# Altium PCB STM32F103C8T6核心板.PcbDoc
Units mil, origin at the board's own origin, x right, y up, seen from the top; angles counter-clockwise.
Board outline 4166 x 2426 mil, 2 copper layers (Top Layer, Bottom Layer); 45 components, 35 nets, 190 pads, 10 vias.
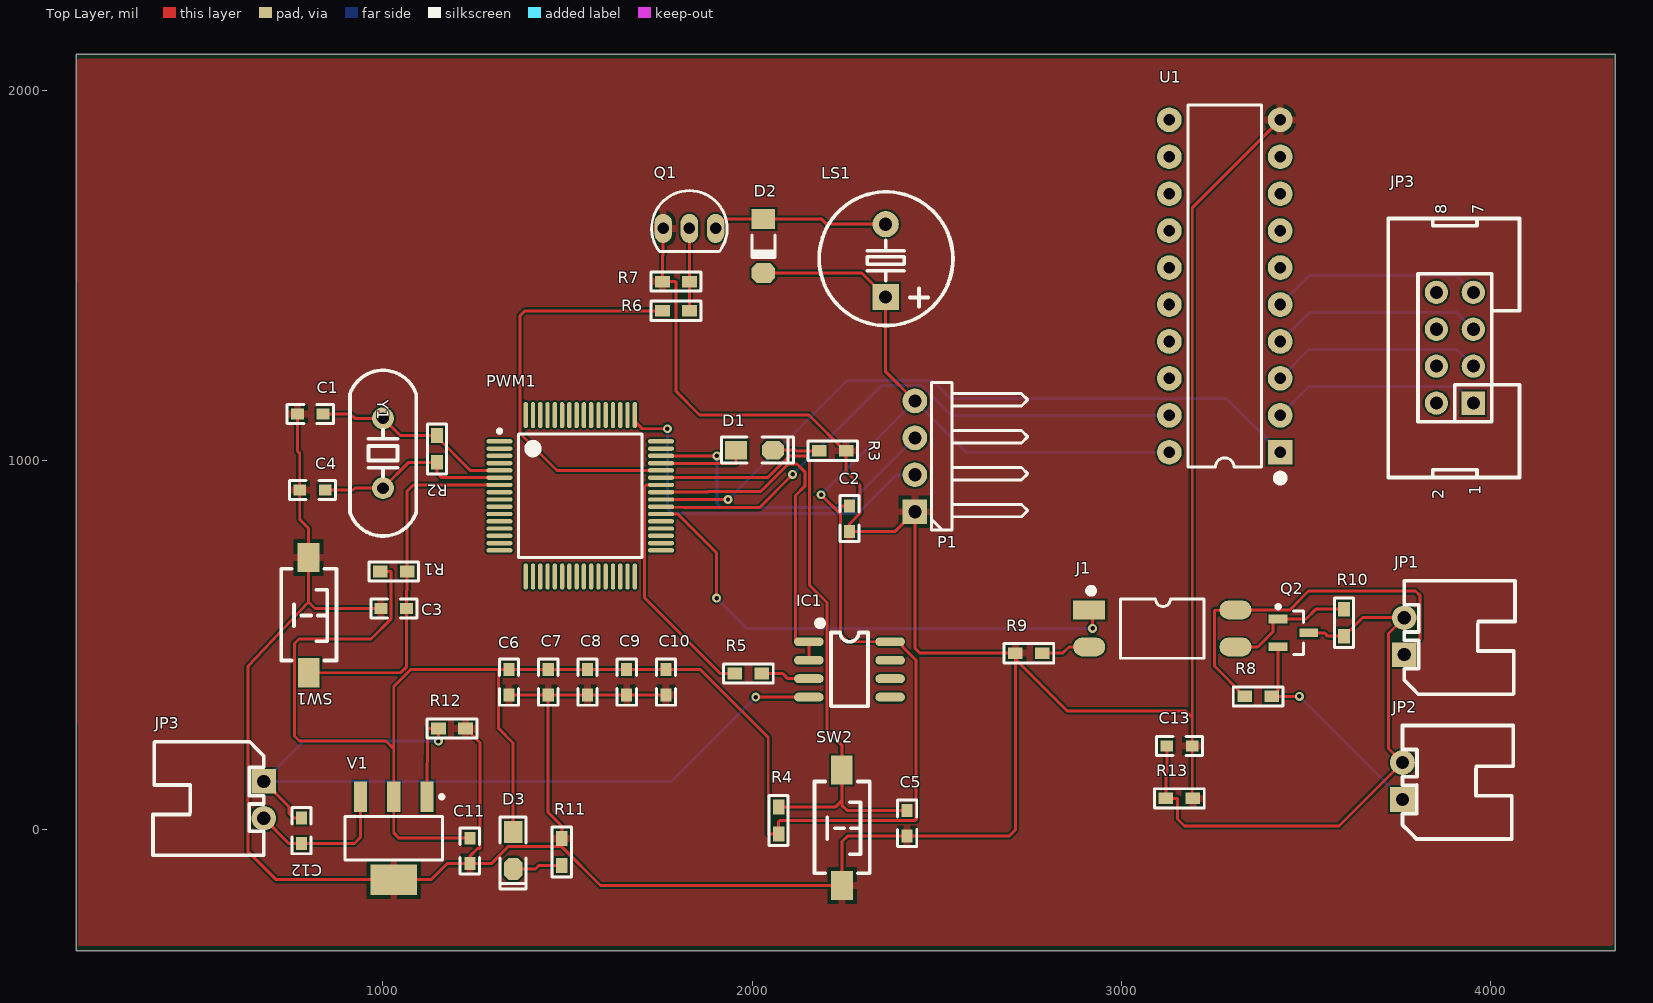
[diagram p0: Top Layer view]
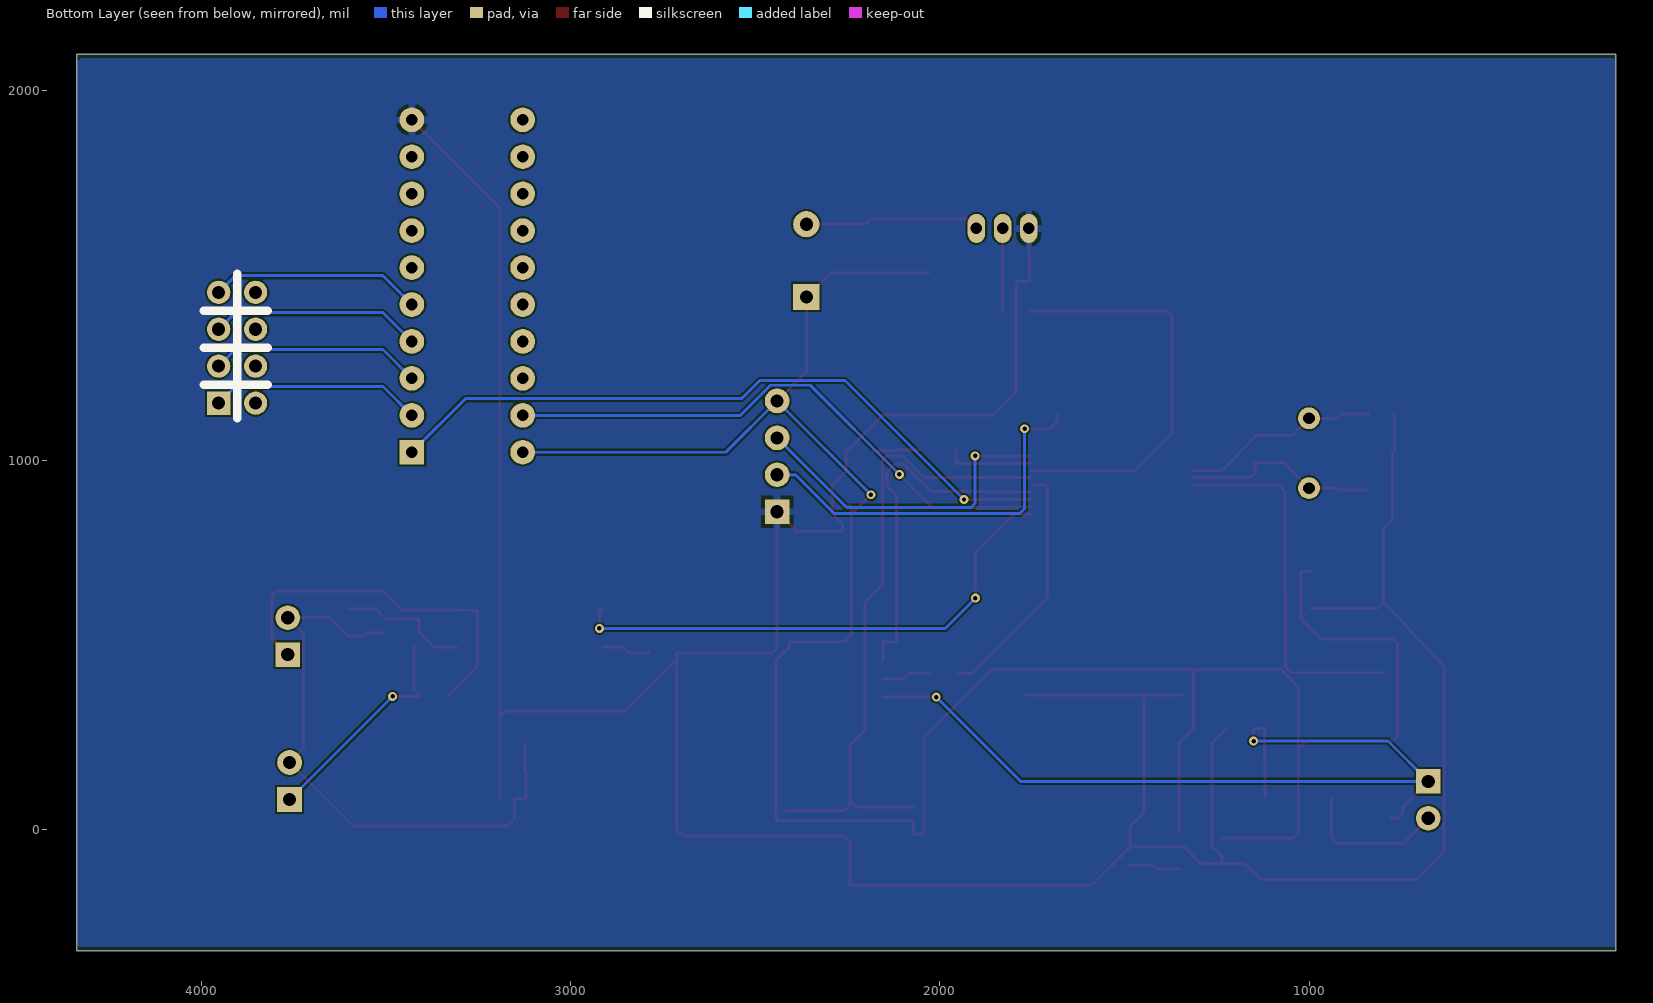
[diagram p1: Bottom Layer view, seen from below]

## Layer stack, top to bottom
Top Solder: solder mask 0.4, Solder Resist, Dk 3.5
Top Layer: signal copper 1.4
Dielectric1: dielectric 12.6, FR-4, Dk 4.8
Bottom Layer: signal copper 1.4
Bottom Solder: solder mask 0.4, Solder Resist, Dk 3.5

## Board outline
171,-328 171,2098 4337,2098 4337,-328

## Design rules (kind name [scope] priority, off if disabled: settings)
Clearance [All] p1: gap=5 ignorepadtopadclearanceinfootprint=FALSE except(0: Arc-Hole Track-Hole SMDPad-Hole THPad-Hole Via-Hole Fill-Hole Poly-Hole Region-Hole Text-Hole)
FabricationTestPointUsage TestPointUsage [All] p1: valid=0 allowmultiple=FALSE
FabricationTestpoint Testpoint [(IsPad And (OnTopLayer Or OnBottomLayer))] p1: side=3 testpointundercomponent=TRUE minsize=40 maxsize=100 preferedsize=60 minholesize=0 maxholesize=40 preferedholesize=32 testpointgrid=1 allowsidetop=TRUE allowsidebottom=TRUE usegrid=TRUE gridtolerance=0.01
HoleToHoleClearance [All] p1: gap=0 allowstackedmicrovias=TRUE
MinimumSolderMaskSliver [All] p1: minsoldermaskwidth=0
PolygonConnect PolygonConnect_1 [All vs (InPadClass('All Pads'))] p1: connectstyle=Relief reliefconductorwidth=20 reliefentries=4 polygonreliefangle="90 Angle" airgapwidth=10
PolygonConnect [All] p2: connectstyle=Direct reliefconductorwidth=20 reliefentries=4 polygonreliefangle="90 Angle" airgapwidth=10
RoutingVias [All] p1: holewidth=12 width=24 viastyle="Through Hole" minholewidth=12 minwidth=24 maxholewidth=50 maxwidth=100
SilkToSilkClearance [All] p1: silktosilkclearance=0
SilkToSolderMaskClearance SilkscreenOverComponentPads [IsPad] p1: minsilkscreentomaskgap=0 clearancetoexposedcopper=TRUE
SolderMaskExpansion [All] p1: expansion=4 istentingtop=FALSE
Width [All] p1: maxlimit=20 minlimit=6 preferedwidth=8
24 further rules are at their usual default settings.

## Components (designator, comment, footprint, x,y, rotation, side; value= is the part's Value field where it differs from the comment)
C1 "22P,0603" "C 0603" 803.5,1124.64 r180 top value=104
C2 "104,0603" "C 0603" 2264,842 r90 top value=104
C3 "2.2uf" "C 0603" 1031,598 r0 top value=104
C4 "22P,0603" "C 0603" 809.5,918.64 r180 top value=104
C5 "2.2uf" "C 0603" 2420,17 r90 top value=104
C6 "100nf" "C 0603" 1342,399 r90 top value=104
C7 "100nf" "C 0603" 1448.25,399 r90 top value=104
C8 "100nf" "C 0603" 1554.5,399 r90 top value=104
C9 "100nf" "C 0603" 1660.75,399 r90 top value=104
C10 "100nf" "C 0603" 1767,399 r90 top value=104
C11 "100nf" "C 0603" 1236,-59 r270 top value=104
C12 "10uf" "C 0603" 780,-4 r270 top value=104
C13 "100nf" "C 0603" 3158,226 r0 top value=104
D1 "LED" "LED 0805G" 2007,1027 r0 top
D2 "1N4148" "MINI_MELF (LL34)" 2031,1579 r270 top
D3 "LED" "LED 0805G" 1353,-57 r270 top
IC1 "LM358" SOP8_N 2264,433 r0 top
J1 "TLP181" SOP4-W2.54_N 3111,544 r0 top
JP1 "HDR-1X2" XH2.54-WI-2P 3766,523 r90 top
JP2 "HDR-1X2" XH2.54-WI-2P 3761,131 r90 top
JP3 "HDR-1X2" XH2.54-WI-2P 678,80 r270 top
JP3 "Header 4X2" IDC2.54-LI-2x4P 3953,1154 r90 top
LS1 "DC5V" "BEEP 5x9x5.5" 2362,1540 r0 top
P1 "SWD" HDR-1X4_H 2441,860 r90 top
PWM1 "STM32F107RBT6" LQFP64_N 1535,903 r0 top
Q1 "S9013" TO92A 1830.5,1627.03 r0 top
Q2 "N沟道" SOT23-3N 3466,532 r0 top
R1 "10K,0603" "R 0603" 1030,698 r180 top
R2 "1M0603" "R 0603" 1147,1030.17 r90 top
R3 "1k" "R 0603" 2218.5,1025 r0 top
R4 "10k" "R 0603" 2072,24 r270 top
R5 "1k" "R 0603" 1990,422 r0 top
R6 "1k" "R 0603" 1794,1404 r0 top
R7 "1k" "R 0603" 1794,1483 r0 top
R8 "4.7k" "R 0603" 3370.5,360 r180 top
R9 "100R" "R 0603" 2749.5,477 r0 top
R10 "100R" "R 0603" 3603,559.5 r90 top
R11 "1k" "R 0603" 1485,-61 r90 top
R12 "1k" "R 0603" 1188,273 r0 top
R13 "1M" "R 0603" 3157,84 r0 top
SW1 "SW-PB_V" "TSW SMD-3*6*2.5" 800,579 r270 top
SW2 "SW-PB_V" "TSW SMD-3*6*2.5" 2244,3 r270 top
U1 "SN74LV245" DIP-20 3280,1471 r180 top
V1 "AMS1117-3V3" SOT223_L 1030,-24 r270 top
Y1 "8M" "XTAL-49S DIP" 1001,1018.49 r90 top

## Footprints (in the part's own frame and the unit in brackets; to place one, negate y for a bottom-side part, rotate by r counter-clockwise, add the part's x,y. Pads: shape width x height; smd on the part's side, far side on the other; paste and mask are expansions set on the pad)
"BEEP 5x9x5.5" [mm] "5*9*5.5mm(脚距,直径,高度)        淘宝ID:黄晶宝石"
  rect 1.8x1.8 hole 0.9: 1(0,-2.5)
  round 1.8 hole 0.9: 2(0,2.5)
  silkscreen extent -4.58,-4.47 4.62,4.72, body extent -4.5,-4.5 4.5,4.5, height 5.45
"C 0603" [mil] "无极性贴片电容"
  rect 35x30 smd: 1(-35,0) 2(34,0)
  silkscreen extent -63,-26 62,26, body extent -31,-16 31,16, height 32
DIP-20 [mm] "26.4*7.6*3.8(长宽高）淘宝ID:黄晶宝石   店铺网址:https://shop463601444.taobao.com"
  rect 1.7x1.7 hole 0.8: 1(-3.81,11.43)
  round 1.7 hole 0.8: 2(-3.81,8.89) 3(-3.81,6.35) 4(-3.81,3.81) 5(-3.81,1.27) 6(-3.81,-1.27) 7(-3.81,-3.81) 8(-3.81,-6.35) 9(-3.81,-8.89) 10(-3.81,-11.43) 11(3.81,-11.43) 12(3.81,-8.89) 13(3.81,-6.35) 14(3.81,-3.81) 15(3.81,-1.27) 16(3.81,1.27) 17(3.81,3.81) 18(3.81,6.35) 19(3.81,8.89) 20(3.81,11.43)
  silkscreen extent -4.06,-12.45 2.54,13.46, body extent -4,-13.2 4,13.2, height 4.5
HDR-1X4_H [mm] "弯脚排针，4脚"
  rect 1.7x1.7 hole 0.9: 1(0,0)
  round 1.7 hole 0.9: 2(2.54,0) 3(5.08,0) 4(7.62,0)
  silkscreen extent -1.27,-7.76 8.89,-1.14, body extent -1.27,-7.77 8.89,1.27, height 4.85
IDC2.54-LI-2x4P [mm] "8P简易牛角座 淘宝ID:黄晶宝石   店铺网址:https://shop463601444.taobao.com"
  rect 1.6x1.6 hole 0.9: 1(0,0)
  round 1.6 hole 0.9: 2(0,2.54) 3(2.54,0) 4(2.54,2.54) 5(5.08,0) 6(5.08,2.54) 7(7.62,0) 8(7.62,2.54)
  silkscreen extent -5.11,-3.18 12.7,5.84, body extent -5.08,-3.08 12.7,5.77, height 9.17
"LED 0805G" [mil] "绿色0805LED"
  rect 60x50 smd: 1(-50,0)
  oct 60x50 smd: 2(50,0)
  silkscreen extent -90,-35 105,35, body extent -39,-25 39,25, height 32
LQFP64_N [mm] "Thin QFP, 64-Leads, Body 10x10mm, Pitch 0.5mm, IPC Medium Density封装库来自淘宝 ID：黄晶宝石"
  oval 1.8x0.3 smd: 1(-5.55,3.75) 2(-5.55,3.25) 3(-5.55,2.75) 4(-5.55,2.25) 5(-5.55,1.75) 6(-5.55,1.25) 7(-5.55,0.75) 8(-5.55,0.25) 9(-5.55,-0.25) 10(-5.55,-0.75) 11(-5.55,-1.25) 12(-5.55,-1.75) 13(-5.55,-2.25) 14(-5.55,-2.75) 15(-5.55,-3.25) 16(-5.55,-3.75) 33(5.55,-3.75) 34(5.55,-3.25) 35(5.55,-2.75) 36(5.55,-2.25) 37(5.55,-1.75) 38(5.55,-1.25) 39(5.55,-0.75) 40(5.55,-0.25) 41(5.55,0.25) 42(5.55,0.75) 43(5.55,1.25) 44(5.55,1.75) 45(5.55,2.25) 46(5.55,2.75) 47(5.55,3.25) 48(5.55,3.75)
  oval 0.3x1.8 smd: 17(-3.75,-5.55) 18(-3.25,-5.55) 19(-2.75,-5.55) 20(-2.25,-5.55) 21(-1.75,-5.55) 22(-1.25,-5.55) 23(-0.75,-5.55) 24(-0.25,-5.55) 25(0.25,-5.55) 26(0.75,-5.55) 27(1.25,-5.55) 28(1.75,-5.55) 29(2.25,-5.55) 30(2.75,-5.55) 31(3.25,-5.55) 32(3.75,-5.55) 49(3.75,5.55) 50(3.25,5.55) 51(2.75,5.55) 52(2.25,5.55) 53(1.75,5.55) 54(1.25,5.55) 55(0.75,5.55) 56(0.25,5.55) 57(-0.25,5.55) 58(-0.75,5.55) 59(-1.25,5.55) 60(-1.75,5.55) 61(-2.25,5.55) 62(-2.75,5.55) 63(-3.25,5.55) 64(-3.75,5.55)
  silkscreen extent -5.67,-4.25 4.25,4.57, body extent -6,-6 6,6, height 1.45
"MINI_MELF (LL34)" [mm] "1.5*3.4mm(直径，脚距）"
  rect 1.37x1.62 smd: 1(-1.855,0)
  oct 1.37x1.62 smd: 2(1.855,0)
  silkscreen extent -0.76,-0.8 0.78,0.8, body extent -1.7,-0.75 1.7,0.75, height 1.5
"R 0603" [mil] "1/10W贴片电阻"
  rect 40x31.5 smd: 1(-36.5,0) 2(36.5,0)
  silkscreen extent -68,-26 68,26, body extent -31,-16 31,16, height 16
SOP4-W2.54_N [mm] "6.5*4.58*3.5mm（长宽高）  淘宝ID:黄晶宝石"
  rect 2.2x1.3 smd: 1(-5.029,1.27)
  oval 2.2x1.3 smd: 2(-5.029,-1.27) 3(5.029,-1.27) 4(5.029,1.27)
  silkscreen extent -5.06,-2.05 2.87,2.75, body extent -5,-2.29 5,2.29, height 3.6
SOP8_N [mil] "5*6*1.8mm（长宽高）"
  oval 80x24 smd: 1(-110,75) 2(-110,25) 3(-110,-25) 4(-110,-75) 5(110,-75) 6(110,-25) 7(110,25) 8(110,75)
  silkscreen extent -86,-100 50,131, body extent -118,-98 118,98, height 75
SOT23-3N [mm] "SOT23, 3-Leads, Body 2.9x1.3mm, Pitch 0.95mm, Lead Span 2.4mm, IPC Medium Density"
  rect 1.3x0.6 smd: 1(-1.05,0.95) 2(-1.05,-0.95) 3(1.05,0)
  silkscreen extent -1.17,-1.5 0.7,1.92, body extent -1.2,-1.5 1.2,1.5, height 1.05
SOT223_L [mm] "SOT223, 4-Leads, Body 6.5x3.5mm, Pitch 2.3mm, Lead Span 7mm, IPC High Density"
  rect 2.1x0.9 smd: 1(-2.85,2.3) 2(-2.85,0) 3(-2.85,-2.3)
  rect 2.1x3.2 smd: 4(2.85,0)
  silkscreen extent -2.97,-3.35 1.5,3.43, body extent -3.51,-3.25 3.51,3.25, height 1.65
TO92A [mm] "TO, Flat Index; 3 In-Line, Axial Leads; Body Dia. 4.8mm; Leads 0.48 x 0.5 mm (max)"
  oval 1.2x2 hole 0.8: 1(-1.8,0) 2(0,0) 3(1.8,0)
  silkscreen extent -2.6,-1.6 2.6,2.6, body extent -2.3,-1.3 2.3,2.3, height 7.6
"TSW SMD-3*6*2.5" [mm] "3*6*2.5mm"
  rect 2x1.5 smd: 1(-3.996,-0.02) 2(3.937,0)
  silkscreen extent -3.21,-1.9 3.09,1.9, body extent -4,-1.88 4,1.62, height 2.59
XH2.54-WI-2P [mm] "接插件，2P"
  rect 1.7x1.7 hole 0.9: 1(-1.27,0)
  round 1.7 hole 0.9: 2(1.27,0)
  silkscreen extent -3.99,-7.62 3.81,0, body extent -3.77,-7.35 3.77,0.35, height 5.75
"XTAL-49S DIP" [mm]
  round 1.5 hole 0.8: 1(-2.4,0) 2(2.4,0)
  silkscreen extent -5.7,-2.28 5.7,2.28, body extent -5.68,-2.35 5.68,2.3, height 3.5

## Part data
C1 C2 C3 C4 C5 C6 C7 C8 C9 C10 C11 C12 C13: library part Cap, "Capacitor", LatestRevisionDate=17-Jul-2002, LatestRevisionNote="Re-released for DXP Platform.", Published=8-Jun-2000, Publisher="Altium Limited"
D2: "开关二极管", BOM名称=高速开关二极管, 联系卖家，免费查找封装=唯一出售店铺网址https://shop463601444.taobao.com
IC1: "双路运放", BOM名称=双路运放, 联系卖家，免费查找封装=唯一出售店铺网址https://shop463601444.taobao.com
J1: library part TLP521-1, "1路开关光耦", BOM名称=1路开关光耦, 封装库来自 淘宝卖家 ID：黄晶宝石=其他店铺购入均为盗版假冒封装库，请立即申请退款
JP1 JP2 JP3: library part "Header 2", "2P接插件", BOM名称=2P接插件, 封装库来自淘宝卖家 ID：黄晶宝石=其他店铺购入均为盗版假冒封装库, 联系卖家，免费查找封装=唯一出售店铺网址https://shop463601444.taobao.com
JP3: "4*2P接插件", BOM名称=4*2P接插件, 封装库来自淘宝卖家 ID：黄晶宝石=其他店铺购入均为盗版假冒封装库, 联系卖家，免费查找封装=唯一出售店铺网址https://shop463601444.taobao.com
LS1: library part BEEP, "蜂鸣器", BOM名称=蜂鸣器, 联系卖家，免费查找封装=唯一出售店铺网址https://shop463601444.taobao.com
P1: library part "Header 4", "Header, 4-Pin", LatestRevisionDate=17-Jul-2002, LatestRevisionNote="Re-released for DXP Platform.", Publisher="Altium Limited"
PWM1: "STM32 ARM-based 32-bit MCU Connectivity Line & Ethernet with 128 kB Flash, 48 kB Internal RAM, -40 to +85癈 Temperature, 64-Pin LQFP, Tray", ComponentLink1Description="Manufacturer URL", ComponentLink1URL=http://www.st.com/, ComponentLink2Description="STM32F105/107 Datasheet", ComponentLink2URL=http://www.st.com/internet/com/TECHNICAL_RESOURCES/TECHNICAL_LITERATURE/DATASHEET/CD00220364.pdf, ComponentLink3Description="STM32 Family Web Page", ComponentLink3URL=www.st.com/stm32, DatasheetVersion="rev5.0, May-2010", PackageDescription="64-Pin Low-Profile Quad Flat Pack, 10 x 10 mm Body, 0.5 mm Pitch (LQFP64)", PackageReference=LQFP64, PackageVersion="rev13, Apr-2011", 联系卖家，免费查找封装=唯一出售店铺网址https://shop463601444.taobao.com
Q1: library part 9013-DIP, "低频放大-NPN型", BOM名称=低频放大-NPN型, 参数="50V 0.5A 0.625W", 封装库来自淘宝卖家 ID：黄晶宝石=其他店铺购入均为假冒封装库, 联系卖家，免费查找封装=唯一出售店铺网址https://shop463601444.taobao.com
Q2: library part SI2301, "P沟道 20V/2.8A", BOM名称=P沟道场效应管, 封装库来自淘宝卖家 ID：黄晶宝石=其他店铺购入均为假冒封装库, 联系卖家，免费查找封装=唯一出售店铺网址https://shop463601444.taobao.com
R1 R2 R3 R4 R5 R6 R7 R8 R9 R10 R11 R12 R13: library part Res2, "Resistor", LatestRevisionDate=17-Jul-2002, LatestRevisionNote="Re-released for DXP Platform.", Published=8-Jun-2000, Publisher="Altium Limited"
SW1 SW2: "SWITCH"
U1: library part SN74LS642, "OCTAL BUS TRANCEIVER", 技术支持，联系售后=唯一出售店铺网址https://shop463601444.taobao.com
V1: library part AMS1117, "三端稳压芯片", BOM名称=稳压芯片, 封装库来自淘宝卖家 ID：黄晶宝石=其他店铺购入均为假冒，请立即申请退款，本店奖励5~10元现金, 联系卖家 免费查找封装=唯一出售店铺网址https://shop463601444.taobao.com
Y1: library part XTAL, "Crystal Oscillator", LatestRevisionDate=17-Jul-2002, LatestRevisionNote="Re-released for DXP Platform.", Published=8-Jun-2000, Publisher="Altium Limited"

## Via types
v1: diameter 24, hole 12, Top Layer to Bottom Layer, 10 vias

## Nets (pads, with @x,y where several pads share a name; then routed paths per layer and width w, separated by ;. In a path a pad name is that pad's centre, name@x,y a point inside that pad or via, vN(x,y) a via of type N, cw(c..) or ccw(c..) an arc to the next point about the centre after c; other vN are vias at no path point)
5V: C12.2 JP3.2@678,30 V1.3 | length 406.4
  Top Layer w8: JP3.2@678,30 746,-38 C12.2 923.45,-38 939.45,-22 V1.3
245_DIR: PWM1.40 U1.1 | length 1890.6
  Top Layer w8: PWM1.40 v1(1935,893.16)
  Bottom Layer w8: v1(1935,893.16) 2257.31,1215.47 2488.29,1215.47 2537.76,1166 3285,1166 U1.1
245_OE: PWM1.39 U1.19 | length 1547.6
  Top Layer w8: PWM1.39 1814.47,871 2020,871 v1(2110,961)
  Bottom Layer w8: v1(2110,961) 2351.47,1202.47 2459,1202.47 2540.47,1121 U1.19
A1: JP3.1@3953,1154 U1.2 | length 573.9
  Bottom Layer w8: U1.2 3508,1199 3908,1199 JP3.1@3953,1154
A2: JP3.3 U1.3 | length 573.9
  Bottom Layer w8: U1.3 3508,1299 3908,1299 JP3.3
A3: JP3.5 U1.4 | length 573.9
  Bottom Layer w8: U1.4 3508,1399 3908,1399 JP3.5
A4: JP3.7 U1.5 | length 573.9
  Bottom Layer w8: U1.5 3508,1499 3908,1499 JP3.7
AGND: C12.1 IC1.4 JP3.1@678,130 R12.1 V1.1 | length 2490.9
  Top Layer w8: JP3.1@678,130 746.5,61.5 746.5,43.5 759,31 C12.1 ; V1.1 1121.55,273 R12.1@1151,273 ; v1(1151,239) R12.1@1151,273 ; R12.1 R12.1@1151,273 ; v1(2010,358) IC1.4
  Bottom Layer w8: v1(1151,239) 787,239 678,130 1782,130 v1(2010,358)
ANALOG_INPUT: C5.2 PWM1.43 R4.1 SW2.1 | length 1763.8
  Top Layer w8: PWM1.43 2042.21,952.21 2100.81,1010.81 2145.19,1010.81 2156,1000 2156,661 2203,614 2203,268.21 2243.21,228 SW2.1 2243.21,78 ; R4.1 2072,60 2225.21,60 2243.21,78 ; C5.2 2257.71,51 2243.21,65.5 2243.21,78
B1: JP3.2@3853,1154
B2: JP3.4
B3: JP3.6
B4: JP3.8
BEEP: PWM1.44 R6.1 | length 1132.6
  Top Layer w8: PWM1.44 1472.1,971.9 1372,1072 1372,1390.5 1385.5,1404 R6.1
DGND: C1.2 C2.1 C3.1 C4.2 C5.1 C6.1 C7.1 C8.1 C9.1 C10.1 C11.2 C13.2 P1.1 Q1.1 R3.2 R7.1 R9.1 R11.2 R12.2 R13.2 SW1.1 SW2.2 U1.10 V1.4 | length 10094.1
  Top Layer w8: C1.2 769.5,1024 775.5,1018 C4.2 775.5,838.71 799.21,815 SW1.1 799.21,615.5 ; C3.1 816.71,598 799.21,615.5 ; R12.2 1264,233.5 1264,-52 1257,-52 1236,-73 C11.2 ; C6.1 C7.1 ; Q1.1 1759.63,1555.13 1757.5,1553 R7.1 1793,1483 1794,1482 1794,1186 1858,1122 2154,1122 2251,1025 R3.2 2255,969 2292,932 2292,855 2264,827 C2.1 2388,807 P1.1 2441,490.5 2454.5,477 R9.1 2713,461 ; C10.1 C9.1 C8.1 C7.1 ; R13.2 3192,84 C13.2 3192,303 ; U1.10 3192,1683 3192,303 ; 799.21,615.5 635,441 635,-59.5 711.7,-136.2 V1.4 1131,-136.2 1174.2,-93 C11.2 ; C11.2 1294,-93 1341,-46 1485,-46 ; C7.1 1448.25,45.75 1485,9 R11.2 1485,-46 ; 1485,-46 1485,-47 1590,-152 SW2.2 2244,-33 2259,-18 C5.1 2696.5,-18 2713,-1.5 2713,461 ; 2713,461 2853,321 3174,321 3192,303
HIGH_OUT: PWM1.42 R5.1 | length 676.8
  Top Layer w8: PWM1.42 1713.53,932.53 1709,928 1709,627 1914,422 R5.1
HIGH_READ: IC1.1 IC1.2 PWM1.41 | length 986.6
  Top Layer w8: PWM1.41 1878.84,912.84 1881,915 2023.39,915 2097.92,989.54 2121.5,989.54 2143,968.04 2143,929 2118,904 2118,508 IC1.1 IC1.2
LEDTEST: D1.1 PWM1.45 | length 240.6
  Top Layer w8: PWM1.45 1783,991.58 1784.58,990 1956,990 1957,991 D1.1
NetD1_2: D1.2 R3.1 | length 125.8
  Top Layer w8: D1.2 2118,1027 2120,1025 R3.1
NetD2_1: D2.1 LS1.2 Q1.3 | length 476.6
  Top Layer w8: Q1.3 1926.37,1652.03 D2.1 2189,1652.03 2202.61,1638.43 LS1.2
NetD3_2: D3.2 R11.1 | length 135.9
  Top Layer w8: D3.2 1414,-107 1423.5,-97.5 R11.1
NetIC1_3: IC1.3 R5.2 | length 133.3
  Top Layer w8: R5.2 2083,422 2097,408 IC1.3
NetJ1_2: J1.2 R9.2 | length 134
  Top Layer w8: R9.2 2841,477 2858,494 J1.2
NetJ1_3: J1.3 Q2.1 R10.2 | length 355.8
  Top Layer w8: J1.3 3369,494 3411,536 3411,569.4 Q2.1 3500,569.4 3526.6,596 R10.2
NetJP2_1: JP2.1 Q2.2 R8.1 | length 611.5
  Top Layer w8: Q2.2 3424.66,377.66 R8.1 v1(3482,360)
  Bottom Layer w8: v1(3482,360) JP2.1
NetQ1_2: Q1.2 R6.2 R7.2 | length 223
  Top Layer w8: R6.2 R7.2 Q1.2
OSCIN: C1.1 PWM1.5 R2.2 Y1.2 | length 544
  Top Layer w8: C1.1 913,1124.64 924.66,1112.98 Y1.2 1047.31,1066.67 R2.2 1147,1062 1237.1,971.9 PWM1.5
OSCOUT: C4.1 PWM1.6 R2.1 Y1.1 | length 536.7
  Top Layer w8: C4.1 920,918.64 925.36,924 Y1.1 1070.67,993.67 R2.1 1147,965.5 1160.29,952.21 PWM1.6
PGND: C13.1 JP1.2 JP2.2 Q2.3 R10.1 R13.1 | length 1626.7
  Top Layer w8: C13.1 3123,155.5 3120.5,153 R13.1 3151,84 3152,83 3152,28 3171,9 3589,9 JP2.2 3723,219 3723,530 JP1.2 3653,573 R10.1 3559,523 3550,532 Q2.3
PWM: J1.1 PWM1.38 | length 1427.7
  Top Layer w8: PWM1.38 1799,853.79 1904,748.79 v1(1904,626) ; J1.1 2922,594 v1(2922,544)
  Bottom Layer w8: v1(1904,626) 1986,544 v1(2922,544)
RESET: C3.2 PWM1.7 R1.1 SW1.2 | length 1005.5
  Top Layer w8: SW1.2 1048.5,424 1065,440.5 C3.2 1065,647 1066.5,648.5 R1.1 1066,698 1066,915.5 1083.03,932.53 PWM1.7
SWDCLK: P1.2 PWM1.49 | length 1048.8
  Top Layer w8: PWM1.49 1682.64,1105 1703,1084.64 v1(1771,1084.64)
  Bottom Layer w8: v1(1771,1084.64) 1771,868 1784,855 2286.5,855 2391.5,960 P1.2
SWDIO: P1.3 PWM1.46 | length 898.8
  Top Layer w8: PWM1.46 v1(1905,1011.27)
  Bottom Layer w8: v1(1905,1011.27) 1905,882 1915,872 2253,872 P1.3
VCC15V: J1.4 JP1.1 R8.2 | length 1027.6
  Top Layer w8: R8.2 3252,442 3252,593 J1.4 3456,594 3507,645 3796.5,645 3809,632.5 3809,516 JP1.1
VDD_3V3: C2.2 C6.2 C7.2 C8.2 C9.2 C10.2 C11.1 D2.2 D3.1 IC1.8 LS1.1 P1.4 R1.2 R4.2 U1.20 V1.2 | length 6749.5
  Top Layer w8: R1.2 1022,698 1023,570 968.5,515.5 773.5,515.5 761,503 761,253 775,239 1009,239 1030,218 ; C11.1 1044.5,-24 1030,-9.5 V1.2 1030,218 ; D3.1 1353,234 1314,273 1314,432 1315,433 ; D2.2 2297.61,1505.97 LS1.1 2362,1239 P1.4 ; v1(2187,906) 2240,853 ; C2.2 2241,876 2240,875 2240,853 ; 1030,218 1030,387 1076,433 1315,433 ; 1315,433 C6.2 C7.2 C8.2 C9.2 C10.2 1860,433 2044,249 2044,-12 2045,-13 2072,-13 R4.2 2072,21 2075,24 2443,24 2444,25 2444,458 2407,495 2407,508 IC1.8 2259,508 2240,527 2240,853
  Bottom Layer w8: v1(2187,906) P1.4 2580,1021 U1.20
pads on no net: IC1.5 IC1.6 IC1.7 PWM1.1 PWM1.2 PWM1.3 PWM1.4 PWM1.8 PWM1.9 PWM1.10 PWM1.11 PWM1.12 PWM1.13 PWM1.14 PWM1.15 PWM1.16 PWM1.17 PWM1.18 PWM1.19 PWM1.20 PWM1.21 PWM1.22 PWM1.23 PWM1.24 PWM1.25 PWM1.26 PWM1.27 PWM1.28 PWM1.29 PWM1.30 PWM1.31 PWM1.32 PWM1.33 PWM1.34 PWM1.35 PWM1.36 PWM1.37 PWM1.47 PWM1.48 PWM1.50 PWM1.51 PWM1.52 PWM1.53 PWM1.54 PWM1.55 PWM1.56 PWM1.57 PWM1.58 PWM1.59 PWM1.60 PWM1.61 PWM1.62 PWM1.63 PWM1.64 U1.6 U1.7 U1.8 U1.9 U1.11 U1.12 U1.13 U1.14 U1.15 U1.16 U1.17 U1.18

## Polygon pours and split planes (outlines as drawn)
DGND on Top Layer "DGND_L01_P001" (solid, pour order 1): 173,2086 4331,2086 4332,2085 4332,-311 4328,-315 176,-315
DGND on Bottom Layer "DGND_L02_P002" (solid, pour order 2): 172,2092 176,2088 4325,2088 4338,2075 4338,-311 4331,-318 173,-318

## Silkscreen, mask and mechanical layers (free items; w line width, h text height)
Mechanical 1:
  lines w10: 171,-328 4337,-328 4337,2098 171,2098 171,-328 ; 173,-318 4341,-318 4341,2089 173,2089 173,-318

## Text inside footprints (layer, text, board x,y; h text height)
JP3: Top Overlay "2" at 3873,894 h32 r90; Top Overlay "1" at 3973,904 h32 r90; Top Overlay "8" at 3881,1666 h32 r90; Top Overlay "7" at 3981,1666 h32 r90